# Altium PCB TriMod Adapter 2.PcbDoc (part 1 of 2)
Units mm, origin at the board's own origin, x right, y up, seen from the top; angles counter-clockwise.
Board outline 35.81 x 82.55 mm, 2 copper layers (Top Layer, Bottom Layer), stack 0.969 mm thick; 35 components, 110 nets, 330 pads, 112 vias.
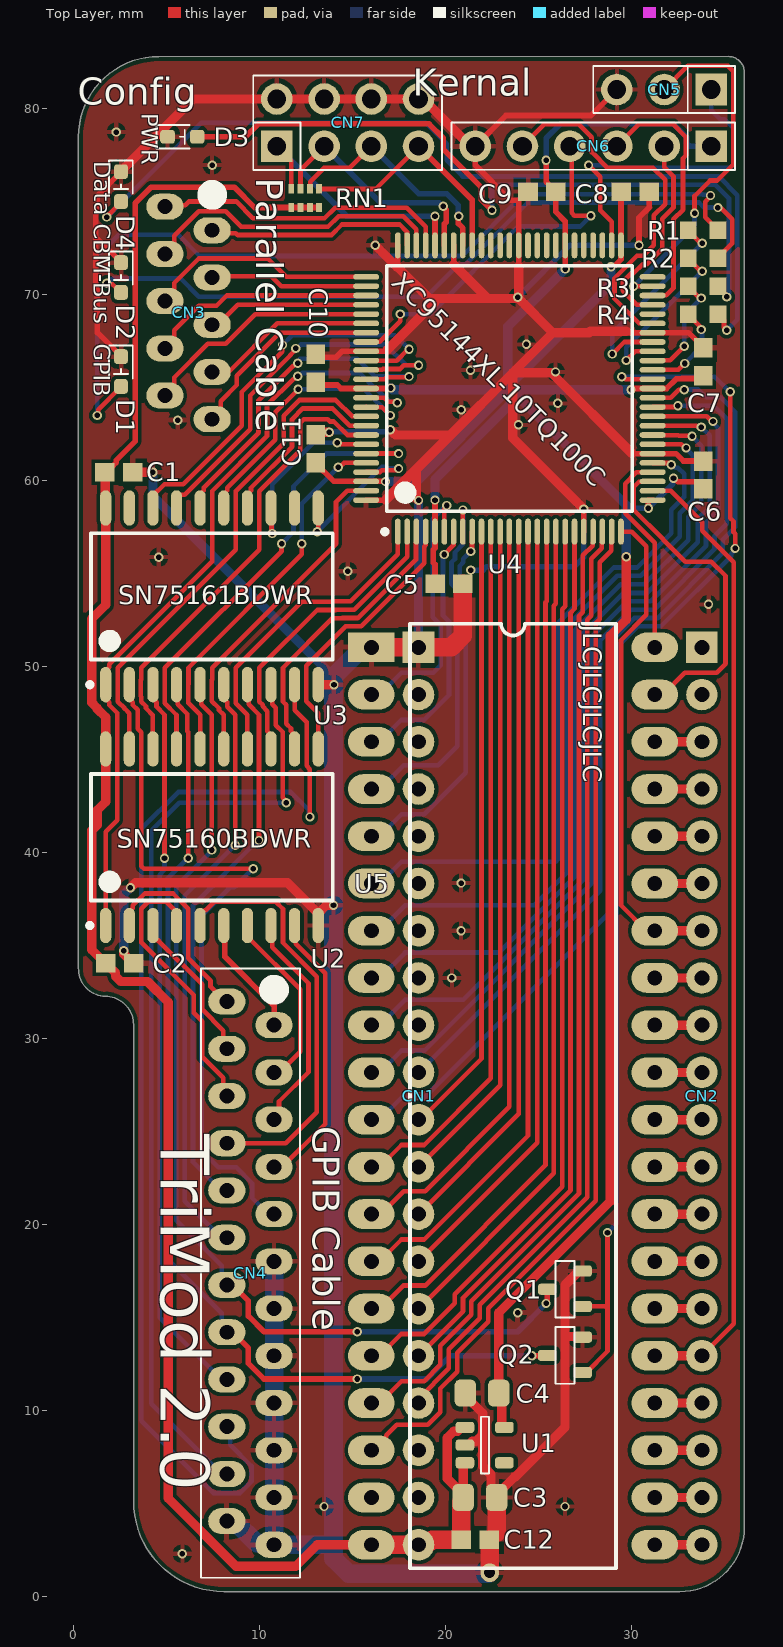
[diagram p0: Top Layer view]
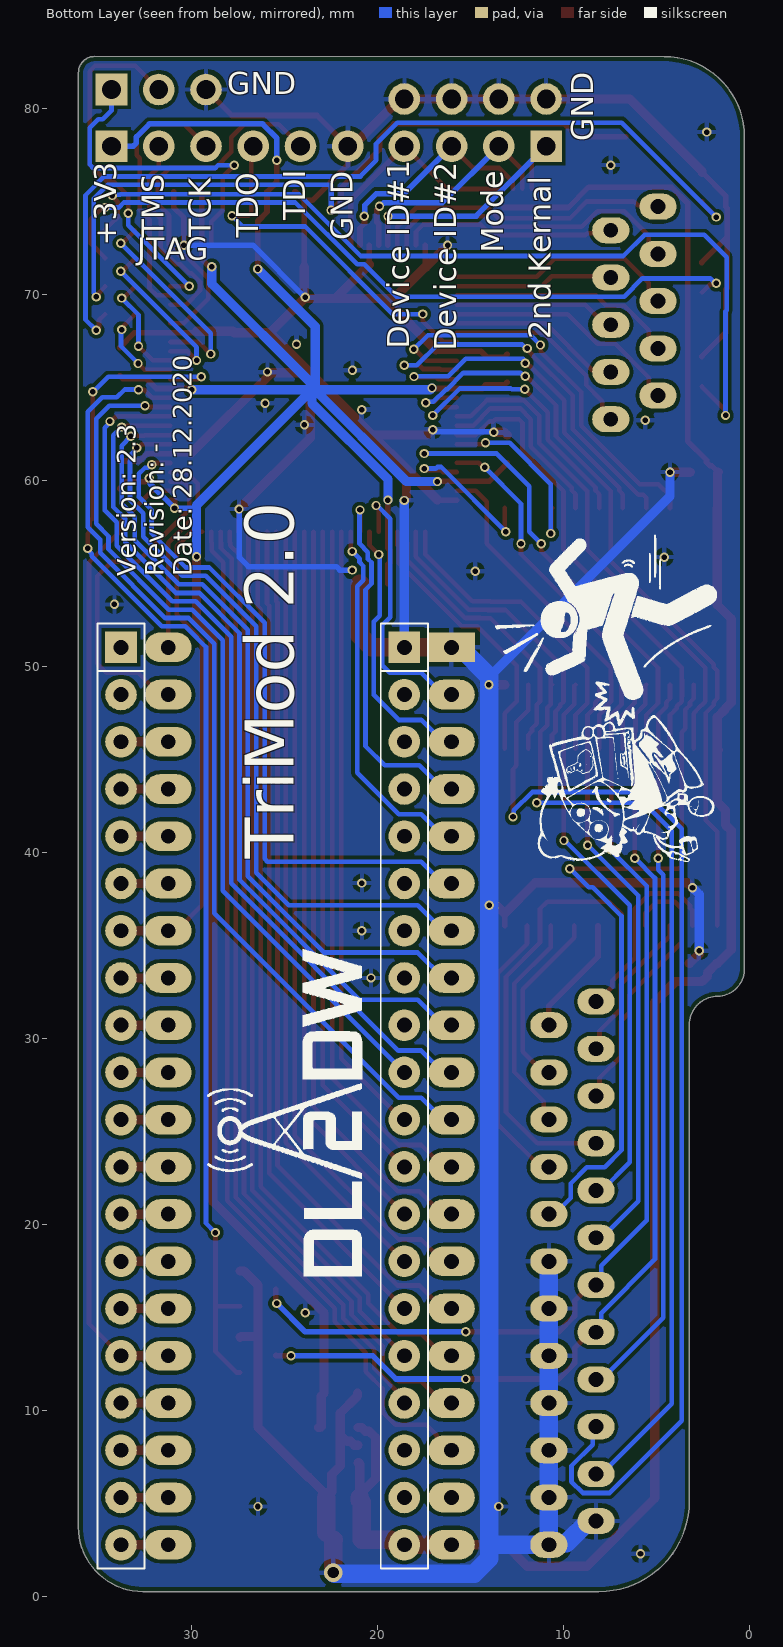
[diagram p1: Bottom Layer view, seen from below]
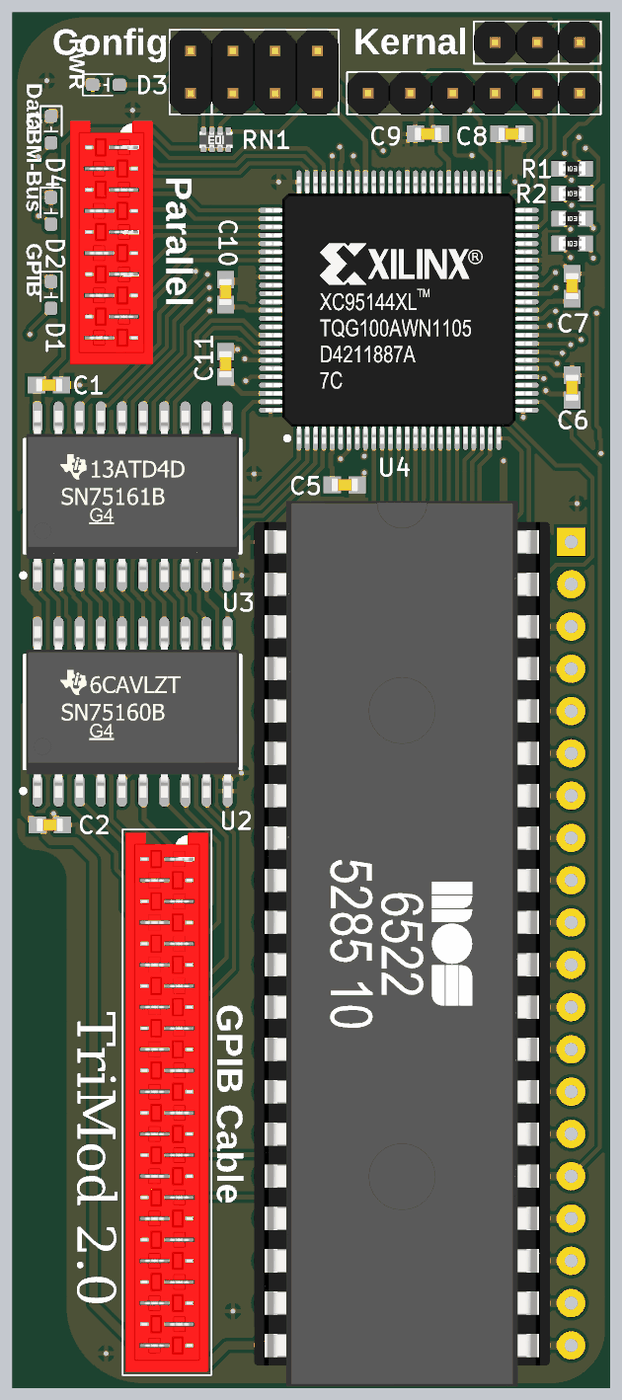
[diagram p2: 3D render of the assembled board from above, using the file's embedded part models]

## Layer stack, top to bottom
Top Solder: solder mask 0.0254, SM-001, Dk 4
Top Layer: signal copper 0.035
Dielectric 1: core 0.8986, Core-043, Dk 4.3
Bottom Layer: signal copper 0.035
Bottom Solder: solder mask 0.0254, SM-001, Dk 4

## Board outline
1.693,32.258 cw(c1.693,30.734) 3.217,30.734 3.217,5.114 ccw(c8.077,5.114) 8.077,0.254 31.496,0.254 32.599,0.254 ccw(c32.599,3.723) 36.068,3.723 36.068,81.937 ccw(c35.201,81.937) 35.201,82.804 4.568,82.8 ccw(c4.568,78.486) 0.254,78.486 0.254,33.782 ccw(c1.735,33.74)

## Design rules (kind name [scope] priority, off if disabled: settings)
BoardOutlineClearance [All] p1: gap=0.254 ignorepadtopadclearanceinfootprint=FALSE
Clearance [All] p1: gap=0.2 ignorepadtopadclearanceinfootprint=TRUE
ComponentClearance ComponentClearance_Sheet [HasFootprint('PCB Title Block DIN A4')] p1: gap=0 collisioncheckmode=3 verticalgap=0 showdistances=FALSE
ComponentClearance [All] p2: gap=0 collisioncheckmode=3 verticalgap=0 showdistances=FALSE
MinimumSolderMaskSliver [All] p1: minsoldermaskwidth=0.103
PolygonConnect [All] p1: connectstyle=Relief reliefconductorwidth=0.254 reliefentries=4 polygonreliefangle="90 Angle" airgapwidth=0.254
RoutingVias RoutingVias_Power [(InNet('+3V3') OR InNet('GND') OR InNet('+5V'))] p1: holewidth=0.6 width=1 viastyle="Through Hole" minholewidth=0.3 minwidth=0.5 maxholewidth=0.6 maxwidth=1
RoutingVias [All] p2: holewidth=0.3 width=0.5 viastyle="Through Hole" minholewidth=0.3 minwidth=0.5 maxholewidth=0.5 maxwidth=0.8
SilkToSilkClearance [All] p1: silktosilkclearance=0
SilkToSolderMaskClearance [IsPad] p1: minsilkscreentomaskgap=0 clearancetoexposedcopper=TRUE
SolderMaskExpansion [All] p1: expansion=0.038 istentingtop=FALSE
UnRoutedNet [All] p1: checkbadconnections=TRUE
Width Width_Power [(InNet('VCC') OR InNet('GND') OR InNet('+5V'))] p1: maxlimit=1 minlimit=0.3 preferedwidth=0.5
Width [All] p2: maxlimit=0.5 minlimit=0.25 preferedwidth=0.3
25 further rules are at their usual default settings.

## Components (designator, comment, footprint, x,y, rotation, side; value= is the part's Value field where it differs from the comment)
C1 "100nF" "CAP 100nF SMD 0603 C0603C104J3RACTU" 2.421,60.452 r180 top
C2 "100nF" "CAP 100nF SMD 0603 C0603C104J3RACTU" 2.467,34.036 r180 top
C3 "10µF" "Kemet C0805CxxxK8RACTU Series H=1.4mm" 21.844,5.31 r180 top
C4 "10µF" "Kemet C0805CxxxK8RACTU Series H=1.4mm" 21.96,10.922 r0 top
C5 "100nF" "CAP 100nF SMD 0603 C0603C104J3RACTU" 20.178,54.456 r180 top
C6 "100nF" "CAP 100nF SMD 0603 C0603C104J3RACTU" 33.842,60.298 r270 top
C7 "100nF" "CAP 100nF SMD 0603 C0603C104J3RACTU" 33.842,66.394 r270 top
C8 "100nF" "CAP 100nF SMD 0603 C0603C104J3RACTU" 30.201,75.54 r180 top
C9 "100nF" "CAP 100nF SMD 0603 C0603C104J3RACTU" 25.178,75.538 r0 top
C10 "100nF" "CAP 100nF SMD 0603 C0603C104J3RACTU" 13.014,66.04 r270 top
C11 "100nF" "CAP 100nF SMD 0603 C0603C104J3RACTU" 13.014,61.7 r270 top
C12 "100nF" "CAP 100nF SMD 0603 C0603C104J3RACTU" 21.59,3.048 r180 top
CN1 "Pin Header Left Side" "Pin Header 01x20 2.54mm precision Horizontal Male" 18.542,51.03 r270 top locked
CN2 "Pin Header Right Side" "Pin Header 01x20 2.54mm precision Horizontal Male" 33.782,51.03 r270 top locked
CN3 "Parallel Cable" "MPE 369-1-010 Buchsenleisten MicroMatch 1,27 mm,2X05,gerade" 6.172,69.011 r270 top
CN4 "GPIB Cable" "IEEE-488 Micro Match Connector" 9.502,17.375 r270 top
CN5 "Kernal" "Pin Header 01x03 2.54mm Horizontal Male" 34.29,81.026 r180 top
CN6 "JTAG" "Pin Header 01x06 2.54mm Horizontal Male" 34.29,77.978 r180 top
CN7 "Config" "Pin Header 02x04 2.54mm Horizontal Male" 10.922,77.978 r0 top
D1 "GPIB" "LED Blue SMD 0603" 2.54,65.861 r270 top
D2 "CBM-Bus" "LED Green SMD 0603" 2.54,70.916 r270 top
D3 "PWR" "LED Red SMD 0603" 5.842,78.486 r0 top
D4 "Data" "LED Yellow SMD 0603" 2.54,75.808 r270 top
Q1 "BCR135" "BCR135 SOT23" 26.416,16.51 r90 top
Q2 "BCR135" "BCR135 SOT23" 26.416,12.954 r90 top
R1 "1k" "1k Ohm R 0603 SMD" 33.842,73.45 r0 top
R2 "1k" "1k Ohm R 0603 SMD" 33.842,71.95 r0 top
R3 "1k" "1k Ohm R 0603 SMD" 33.842,70.45 r0 top
R4 "1k" "1k Ohm R 0603 SMD" 33.842,68.95 r0 top
RN1 "10k" "RES ARRAY 4 RES 10K OHM 0804" 12.446,75.184 r270 top
U1 "SPX5205M5-L-3-3/TR" SOT-23-5 22.098,8.128 r270 top
U2 "SN75160BDWR" "SN75160BDWR SOIC-20 W7.5mm P1,27mm" 7.432,40.818 r90 top locked
U3 "SN75161BDWR" "SN75161BDWR SOIC-20 W7.5mm P1,27mm" 7.432,53.772 r90 top
U4 "XC95144XL-10TQ100C" "TQFP-100 P0.5mm XC95144XL-7TQ100C" 23.428,64.95 r90 top locked
U5 "MOS 6522" "MOS 6522 with Socket" 16.002,51.03 r0 top locked

## Footprints (in the part's own frame and the unit in brackets; to place one, negate y for a bottom-side part, rotate by r counter-clockwise, add the part's x,y. Pads: shape width x height; smd on the part's side, far side on the other; paste and mask are expansions set on the pad)
"1k Ohm R 0603 SMD" [mm] "Chip Resistor 2-Leads, Body 1,60x0,80mm, IPC Medium Density"
  rect 0.9x0.95 smd: 1(-0.8,0) 2(0.8,0)
  body extent -0.8,-0.4 0.8,0.4, height 0.45
"BCR135 SOT23" [mm]
  rrect50% 0.6x1 smd: 1(-0.924,-0.95) 2(0.976,-0.95) 3(0,0.95)
  silkscreen extent -1.52,-0.51 1.52,0.51, body extent -1.45,-1.15 1.45,1.15, height 1
"CAP 100nF SMD 0603 C0603C104J3RACTU" [mm] "Chip Capacitor, 2-Leads, Body 1,60x0,80mm, IPC Medium Density"
  rect 1.05x1 smd: 1(-0.75,0) 2(0.75,0)
  body extent -0.8,-0.4 0.8,0.4, height 0.87
"IEEE-488 Micro Match Connector" [mm]
  oval 1.4x2 hole 0.8: 1(-14.605,-1.27) 2(-12.065,-1.27) 3(-9.525,-1.27) 4(-6.985,-1.27) 5(-4.445,-1.27) 6(-1.905,-1.27) 7(0.635,-1.27) 8(3.175,-1.27) 9(5.715,-1.27) 10(8.255,-1.27) 11(10.795,-1.27) 12(13.335,-1.27) 13(-13.335,1.27) 14(-10.795,1.27) 15(-8.255,1.27) 16(-5.715,1.27) 17(-3.175,1.27) 18(-0.635,1.27) 19(1.905,1.27) 20(4.445,1.27) 21(6.985,1.27) 22(9.525,1.27) 23(12.065,1.27) 24(14.605,1.27)
  silkscreen extent -16.38,-2.67 16.38,2.67, body extent -16.2,-2.5 16.2,2.5, height 3.95
"Kemet C0805CxxxK8RACTU Series H=1.4mm" [mm]
  rrect50% 1.15x1.45 smd: 1(-0.9,0) 2(0.9,0)
  body extent -1,-0.62 1,0.62, height 1.4
"LED Blue SMD 0603" [mm]
  rrect50% 0.8x0.75 smd: 1(-0.8,0) 2(0.8,0)
  silkscreen extent -1.4,-0.64 0.38,0.64, body extent -0.8,-0.4 0.8,0.4, height 0.4
"LED Green SMD 0603" [mm]
  rrect50% 0.8x0.75 smd: 1(-0.8,0) 2(0.8,0)
  silkscreen extent -1.4,-0.64 0.38,0.64, body extent -0.8,-0.4 0.8,0.4, height 0.4
"LED Red SMD 0603" [mm]
  rrect50% 0.8x0.75 smd: 1(-0.8,0) 2(0.8,0)
  silkscreen extent -1.4,-0.64 0.38,0.64, body extent -0.8,-0.4 0.8,0.4, height 0.4
"LED Yellow SMD 0603" [mm]
  rrect50% 0.8x0.75 smd: 1(-0.8,0) 2(0.8,0)
  silkscreen extent -1.4,-0.64 0.38,0.64, body extent -0.8,-0.4 0.8,0.4, height 0.4
"MOS 6522 with Socket" [mm]
  rect 2.5x1.6 hole 0.8: 1(0,0)
  oval 2.5x1.6 hole 0.8: 2(0,-2.54) 3(0,-5.08) 4(0,-7.62) 5(0,-10.16) 6(0,-12.7) 7(0,-15.24) 8(0,-17.78) 9(0,-20.32) 10(0,-22.86) 11(0,-25.4) 12(0,-27.94) 13(0,-30.48) 14(0,-33.02) 15(0,-35.56) 16(0,-38.1) 17(0,-40.64) 18(0,-43.18) 19(0,-45.72) 20(0,-48.26) 21(15.24,-48.26) 22(15.24,-45.72) 23(15.24,-43.18) 24(15.24,-40.64) 25(15.24,-38.1) 26(15.24,-35.56) 27(15.24,-33.02) 28(15.24,-30.48) 29(15.24,-27.94) 30(15.24,-25.4) 31(15.24,-22.86) 32(15.24,-20.32) 33(15.24,-17.78) 34(15.24,-15.24) 35(15.24,-12.7) 36(15.24,-10.16) 37(15.24,-7.62) 38(15.24,-5.08) 39(15.24,-2.54) 40(15.24,0)
  silkscreen extent 2.08,-49.53 13.16,1.27, body extent -1.27,-50.73 16.51,2.47, height 8.6
"MPE 369-1-010 Buchsenleisten MicroMatch 1,27 mm,2X05,gerade" [mm]
  oval 1.4x2 hole 0.8: 1(-5.715,-1.27) 2(-4.445,1.27) 3(-3.175,-1.27) 4(-1.905,1.27) 5(-0.635,-1.27) 6(0.635,1.27) 7(1.905,-1.27) 8(3.175,1.27) 9(4.445,-1.27) 10(5.715,1.27)
  silkscreen extent -6.65,0.97 -6.05,1.57, body extent -7.31,-2.5 7.31,2.5, height 3.95
"Pin Header 01x03 2.54mm Horizontal Male" [mm]
  rect 1.7x1.7 hole 1: 1(0,0)
  round 1.7 hole 1: 2(2.54,0) 3(5.08,0)
  silkscreen extent -1.27,-1.27 6.35,1.27, body extent -1.27,-1.27 6.35,1.27, height 8.34
"Pin Header 01x06 2.54mm Horizontal Male" [mm]
  rect 1.7x1.7 hole 1: 1(0,0)
  round 1.7 hole 1: 2(2.54,0) 3(5.08,0) 4(7.62,0) 5(10.16,0) 6(12.7,0)
  silkscreen extent -1.27,-1.27 13.97,1.27, body extent -1.27,-1.27 13.97,1.27, height 8.34
"Pin Header 01x20 2.54mm precision Horizontal Male" [mm] "Precision"
  rect 1.7x1.7 hole 0.8: 1(0,0)
  round 1.7 hole 0.8: 2(2.54,0) 3(5.08,0) 4(7.62,0) 5(10.16,0) 6(12.7,0) 7(15.24,0) 8(17.78,0) 9(20.32,0) 10(22.86,0) 11(25.4,0) 12(27.94,0) 13(30.48,0) 14(33.02,0) 15(35.56,0) 16(38.1,0) 17(40.64,0) 18(43.18,0) 19(45.72,0) 20(48.26,0)
  body extent -1.27,-1.27 49.53,1.27, height 1.8
"Pin Header 02x04 2.54mm Horizontal Male" [mm]
  rect 1.7x1.7 hole 1: 1(0,0)
  round 1.7 hole 1: 2(0,2.54) 3(2.54,0) 4(2.54,2.54) 5(5.08,0) 6(5.08,2.54) 7(7.62,0) 8(7.62,2.54)
  silkscreen extent -1.27,-1.27 8.89,3.81, body extent -1.27,-1.27 8.89,3.81, height 8.34
"RES ARRAY 4 RES 10K OHM 0804" [mm] "Chip Array, Concave, 8-Leads, Pitch 0,50mm,  Body 2,00x1,00mm,  IPC Medium Density"
  rect 0.5x0.32 smd: 1(-0.5,0.75) 2(-0.5,0.25) 3(-0.5,-0.25) 4(-0.5,-0.75) 5(0.5,-0.75) 6(0.5,-0.25) 7(0.5,0.25) 8(0.5,0.75)
  body extent -0.5,-1 0.5,1, height 0.4
"SN75160BDWR SOIC-20 W7.5mm P1,27mm" [mm] "SOIC, 20-Leads, Body 12,80x7,50mm, Pitch 1,27mm, IPC Medium Density"
  oval 1.9x0.6 smd: 1(-4.75,5.715) 2(-4.75,4.445) 3(-4.75,3.175) 4(-4.75,1.905) 5(-4.75,0.635) 6(-4.75,-0.635) 7(-4.75,-1.905) 8(-4.75,-3.175) 9(-4.75,-4.445) 10(-4.75,-5.715) 11(4.75,-5.715) 12(4.75,-4.445) 13(4.75,-3.175) 14(4.75,-1.905) 15(4.75,-0.635) 16(4.75,0.635) 17(4.75,1.905) 18(4.75,3.175) 19(4.75,4.445) 20(4.75,5.715)
  silkscreen extent -4.87,-6.5 3.4,6.69, body extent -5.15,-6.4 5.15,6.4, height 2.65
"SN75161BDWR SOIC-20 W7.5mm P1,27mm" [mm] "SOIC, 20-Leads, Body 12,80x7,50mm, Pitch 1,27mm, IPC Medium Density"
  oval 1.9x0.6 smd: 1(-4.75,5.715) 2(-4.75,4.445) 3(-4.75,3.175) 4(-4.75,1.905) 5(-4.75,0.635) 6(-4.75,-0.635) 7(-4.75,-1.905) 8(-4.75,-3.175) 9(-4.75,-4.445) 10(-4.75,-5.715) 11(4.75,-5.715) 12(4.75,-4.445) 13(4.75,-3.175) 14(4.75,-1.905) 15(4.75,-0.635) 16(4.75,0.635) 17(4.75,1.905) 18(4.75,3.175) 19(4.75,4.445) 20(4.75,5.715)
  silkscreen extent -4.87,-6.5 3.4,6.69, body extent -5.15,-6.4 5.15,6.4, height 2.65
SOT-23-5 [mm]
  rrect50% 0.6x1 smd: 1(-0.95,-1.06) 2(0,-1.06) 3(0.95,-1.06) 4(0.95,1.06) 5(-0.95,1.06)
  silkscreen extent -1.52,-0.2 1.52,0.23, body extent -1.45,-1.41 1.45,1.41, height 1.3
"TQFP-100 P0.5mm XC95144XL-7TQ100C" [mm] "TSQFP, 100-Leads, Body 14,00x14,00mm, Pitch 0,50mm, IPC Medium Density"
  oval 1.4x0.3 smd: 1(-7.7,6) 2(-7.7,5.5) 3(-7.7,5) 4(-7.7,4.5) 5(-7.7,4) 6(-7.7,3.5) 7(-7.7,3) 8(-7.7,2.5) 9(-7.7,2) 10(-7.7,1.5) 11(-7.7,1) 12(-7.7,0.5) 13(-7.7,0) 14(-7.7,-0.5) 15(-7.7,-1) 16(-7.7,-1.5) 17(-7.7,-2) 18(-7.7,-2.5) 19(-7.7,-3) 20(-7.7,-3.5) 21(-7.7,-4) 22(-7.7,-4.5) 23(-7.7,-5) 24(-7.7,-5.5) 25(-7.7,-6) 51(7.7,-6) 52(7.7,-5.5) 53(7.7,-5) 54(7.7,-4.5) 55(7.7,-4) 56(7.7,-3.5) 57(7.7,-3) 58(7.7,-2.5) 59(7.7,-2) 60(7.7,-1.5) 61(7.7,-1) 62(7.7,-0.5) 63(7.7,0) 64(7.7,0.5) 65(7.7,1) 66(7.7,1.5) 67(7.7,2) 68(7.7,2.5) 69(7.7,3) 70(7.7,3.5) 71(7.7,4) 72(7.7,4.5) 73(7.7,5) 74(7.7,5.5) 75(7.7,6)
  oval 0.3x1.4 smd: 26(-6,-7.7) 27(-5.5,-7.7) 28(-5,-7.7) 29(-4.5,-7.7) 30(-4,-7.7) 31(-3.5,-7.7) 32(-3,-7.7) 33(-2.5,-7.7) 34(-2,-7.7) 35(-1.5,-7.7) 36(-1,-7.7) 37(-0.5,-7.7) 38(0,-7.7) 39(0.5,-7.7) 40(1,-7.7) 41(1.5,-7.7) 42(2,-7.7) 43(2.5,-7.7) 44(3,-7.7) 45(3.5,-7.7) 46(4,-7.7) 47(4.5,-7.7) 48(5,-7.7) 49(5.5,-7.7) 50(6,-7.7) 76(6,7.7) 77(5.5,7.7) 78(5,7.7) 79(4.5,7.7) 80(4,7.7) 81(3.5,7.7) 82(3,7.7) 83(2.5,7.7) 84(2,7.7) 85(1.5,7.7) 86(1,7.7) 87(0.5,7.7) 88(0,7.7) 89(-0.5,7.7) 90(-1,7.7) 91(-1.5,7.7) 92(-2,7.7) 93(-2.5,7.7) 94(-3,7.7) 95(-3.5,7.7) 96(-4,7.7) 97(-4.5,7.7) 98(-5,7.7) 99(-5.5,7.7) 100(-6,7.7)
  silkscreen extent -7.82,-6.6 6.6,6.82, body extent -8.01,-8.01 8.01,8.01, height 1.5

## Part data
C1 C2 C5 C6 C7 C8 C9 C10 C11 C12: library part CMP-Capacitors-Ceramic_Capacitors-00012-1, "KEMET         C0603C104J3RACTU             SMD Multilayer Ceramic Capacitor, 0603 [1608 Metric], 0.1 F, 25 V,  5%, X7R, C Series", Case Code (Imperial)=0603, Case Code (Metric)=1608, Dielectric=X7R, Dielectric Material=Ceramic, Max Operating Temperature=125°C, Min Operating Temperature=-55°C, Package Quantity=4000, Tolerance=5%, Voltage=25V, Capacitance=100nF, Case/Package=0603, Contact Plating=Tin,Matte, Depth=0.8mm, Height=0.8mm, Lead Pitch=0.7mm, Length=1.6mm, Mount="Surface Mount,PCB", Number of Pins=2, Packaging="Tape and Reel", Radiation Hardening=No, REACH SVHC="No SVHC", Termination=SMD/SMT, Thickness=0.034inch, Voltage Rating=25V, Voltage Rating (DC)=25V, Width=0.031inch
C3 C4: library part CMP-Capacitors-Ceramic_Capacitors-00016-2, "KEMET - C0805C106K8RACTU - CAP, 10µF, 10V, 10%, X7R, 0805", Capacitance=10uF, Case Code (Imperial)=0805, Case Code (Metric)=2012, Dielectric=X7R, Dielectric Material=Ceramic, Max Operating Temperature=125°C, Min Operating Temperature=-55°C, Package Quantity=1, Tolerance=10%, Voltage=10V, Case/Package=0805, Depth=1.25mm, Dissipation Factor=7.5%, Height=1.25mm, Length=2mm, Mount="Surface Mount,PCB", Packaging="Tape and Reel", REACH SVHC="No SVHC", Termination=SMD/SMT, Thickness=0.055inch, Voltage Rating=10V, Voltage Rating (DC)=10V, Width=1.2mm
CN1 CN2: library part CMP-Connectors-Male_PIN_Headers-00031-2, "Conn Header Vert 20POS 2MM", Color=Black, Package Quantity=250, Connector Type="Male Pin", Contact Mating Length=0.141inch, Contact Plating=Gold, Mount="Through Hole", Number of Positions=20, Number of Rows=1, Packaging=Bulk, Pitch=0.079inch, Termination=Solder
CN3: library part CMP-Connectors-IDC_Connectors-00031-3, "Grid pitch: 1.27 mm BL2/15-0400GTT-010 RU MPE Garry Conten", Contact Material=Bronze,Tin, Height=3.95mm, Insulation Material=Thermoplastic, Length=14.62mm, Pitch=1.27mm, Width=5mm
CN4: library part CMP-Commodore-00011-5, "IEEE-488 IDC Connector Right Angle or Straight"
CN5: library part CMP-Connectors-Male_PIN_Headers-00002-3, "CONN HEADER .100\" SNGL STR 3POS", Color=Black, Package Quantity=1, Connector Type="Male Pin", Contact Mating Length=0.318inch, Contact Plating=Gold, Mount="Through Hole", Number of Positions=3, Number of Rows=1, Packaging=Bulk, Pitch=0.1inch, Termination=Solder
CN6: library part CMP-Connectors-Male_PIN_Headers-00005-2, "CONN HEADER VERT 6POS 2.54MM", Color=Black, Package Quantity=1, Connector Type="Male Pin", Contact Mating Length=0.318inch, Contact Plating=Gold, Mount="Through Hole", Number of Positions=6, Number of Rows=1, Packaging=Bulk, Pitch=0.1inch, Termination=Solder
CN7: library part CMP-Connectors-Male_PIN_Headers-00033-2, "CONN HEADER .100\" DUAL STR 8POS", Color=Black, Package Quantity=1, Connector Type="Male Pin", Contact Mating Length=0.318inch, Contact Plating=Gold, Contact Type="Male Pin", Mount="Through Hole", Number of Positions=8, Number of Rows=2, Packaging=Bulk, Pitch=0.1inch, RoHS Compliant=Yes, Row Spacing=0.1inch, Series=-, Termination=Solder
D1: library part CMP-LEDs-00001-1, "LED BLUE DIFFUSED 0603 SMD", Case/Package=0603, Color=Blue, Forward Voltage=3.2V, Test Current=20mA, Dominant Wavelength=470nm, Height=0.5mm, Length=1.6mm, Lens Size=0.8mm, Lens Style=Flat, Lens Transparency=Diffused, Luminous Intensity=80mcd, Mount="Surface Mount", Packaging="Tape and Reel", Viewing Angle=140°, Width=0.8mm
D2: library part CMP-LEDs-00004-2, "LED BLUE DIFFUSED 0603 SMD", Case/Package=0603, Color=Blue, Forward Voltage=3.2V, Test Current=20mA, Dominant Wavelength=470nm, Height=0.5mm, Length=1.6mm, Lens Size=0.8mm, Lens Style=Flat, Lens Transparency=Diffused, Luminous Intensity=80mcd, Mount="Surface Mount", Packaging="Tape and Reel", Viewing Angle=140°, Width=0.8mm
D3: library part CMP-LEDs-00005-1, "LED RED DIFFUSED 0603 SMD", Case Code (Imperial)=0603, Case Code (Metric)=1608, Color=Red, Forward Voltage=2V, Test Current=20mA, Case/Package=0603, Dominant Wavelength=630nm, Height=0.5mm, Length=1.6mm, Lens Size=0.8mm, Lens Style=Flat, Lens Transparency=Diffused, Luminous Intensity=70mcd, Mount="Surface Mount", Packaging="Tape and Reel", Viewing Angle=140°, Width=0.8mm
D4: library part CMP-LEDs-00003-2, "LED YELLOW DIFFUSED 0603 SMD", Case Code (Imperial)=0603, Case Code (Metric)=1608, Color=Yellow, Forward Voltage=2V, Test Current=20mA, Case/Package=0603, Dominant Wavelength=589nm, Height=0.5mm, Length=1.6mm, Lens Size=0.8mm, Lens Style=Flat, Lens Transparency=Diffused, Luminous Intensity=100mcd, Mount="Surface Mount", Packaging="Cut Tape", Viewing Angle=140°, Width=0.8mm
Q1 Q2: library part CMP-Transistors-00010-1, "BCR135 Series NPN 50 V 100 mA SMT Silicon Digital Transistor - SOT-23-3", Case/Package=SOT, Collector Emitter Saturation Voltage=300mV, Collector Emitter Voltage (VCEO)=50V, Max Collector Current=100mA, Max Operating Temperature=150°C, Min Operating Temperature=-65°C, Power Dissipation=200mW, Element Configuration=Single, Height=1mm, hFE Min=70, Length=2.9mm, Number of Pins=3, Packaging="Tape and Reel", Polarity=NPN, Width=1.3mm
R1 R2 R3 R4: library part CMP-Resistors-Yageo_SMD_060300002-2, "RES SMD 1K OHM 1% 1/10W 0603", Case Code (Imperial)=0603, Case Code (Metric)=1608, Max Operating Temperature=155°C, Min Operating Temperature=-55°C, Power Rating=100mW, Resistance=1kR, Resistor Type="Thick Film", Temperature Coefficient=100ppm/°C, Tolerance=1%, Voltage Rating=50V, Case/Package=0603, Contact Plating=Tin,Matte, Depth=0.8mm, Height=0.45mm, Lead Free="Lead Free", Length=1.6mm, Military Standard=Not, Packaging="Tape and Reel", Radiation Hardening=No, REACH SVHC="No SVHC", Termination=SMD/SMT
RN1: library part CMP-Resistors-Resistor_Array00009-1, "RES ARRAY 4 RES 10K OHM 0804", Case/Package=0804, Max Operating Temperature=125°C, Min Operating Temperature=-55°C, Number of Resistors=4, Power Per Element=62.5mW, Resistance=10kR, Temperature Coefficient=200ppm/°C, Tolerance=1%, Circuit Type=Isolated, Height=0.02inch, Length=0.079inch, Mount="Surface Mount", Number of Circuits=4, Number of Pins=8, Packaging="Tape and Reel", Width=0.039inch
U1: library part CMP-ICs-Power_Supply-00002-2, "LDO Regulator Pos 3.3V 0.15A 5-Pin SOT-23 T/R", Case/Package=SOT-23, Dropout Voltage=210mV, Max Input Voltage=16V, Max Operating Temperature=125°C, Max Output Current=150mA, Min Input Voltage=2.5V, Min Operating Temperature=-40°C, Min Output Voltage=3.3V, Quiescent Current=1uA, Accuracy=1%, Height=1.15mm, Lead Free="Lead Free", Length=2.9mm, Mount="Surface Mount", Number of Outputs=1, Number of Pins=5, Number of Regulators=1, Output Current=150mA, Output Type=Fixed, Output Voltage=3.3V, Packaging="Tape and Reel", Polarity=Positive, Radiation Hardening=No, Width=1.6mm
U2: library part CMP-ICs-Specials-00023-1, "TEXAS INSTRUMENTS         SN75160BDWR.            GENERAL-PURPOSE INTERFACE BUS  ((NW))", Case/Package=SOIC, High Level Output Current=-5.2mA, Low Level Output Current=48mA, Max Operating Temperature=70°C, Max Supply Current=110mA, Max Supply Voltage=5.25V, Min Operating Temperature=0°C, Min Supply Voltage=4.75V, Operating Supply Voltage=5V, Package Quantity=1, Contact Plating=Gold, ESD Protection=No, Lead Free="Lead Free", Logic Function=Transceiver, Mount="Surface Mount", Nominal Supply Current=110mA, Number of Channels=8, Number of Drivers=8, Number of Pins=20, Number of Receivers=8, Number of Transceivers=1, Number of Transmitters=8, Output Current=48mA, Packaging="Tape and Reel", Propagation Delay=22ns, Radiation Hardening=No, REACH SVHC="No SVHC", Weight=0.018953oz
U3: library part CMP-ICs-Specials-00022-2, "TEXAS INSTRUMENTS         SN75161BDWR", Case/Package=SOIC, High Level Output Current=-5.2mA, Low Level Output Current=48mA, Max Operating Temperature=70°C, Max Supply Voltage=5.25V, Min Operating Temperature=0°C, Min Supply Voltage=4.75V, Nominal Supply Current=110mA, Operating Supply Voltage=5V, Package Quantity=1, Lead Free="Lead Free", Logic Function=Transceiver, Mount="Surface Mount", Number of Channels=8, Number of Drivers=8, Number of Pins=20, Number of Receivers=8, Number of Transceivers=1, Number of Transmitters=8, Operating Supply Current=110mA, Output Current=48mA, Packaging="Tape and Reel", Propagation Delay=22ns, Radiation Hardening=No, REACH SVHC="No SVHC", Weight=0.018953oz
U4: library part CMP-ICs-CPLD_FPGA-00000-1, "IC CPLD 144MC 7.5NS 100TQFP", Case/Package=LQFP, Max Frequency=125MHz, Max Operating Temperature=70°C, Max Supply Voltage=3.6V, Min Operating Temperature=0°C, Min Supply Voltage=3V, Operating Supply Voltage=3.3V, Package Quantity=90, Contact Plating=Tin,Lead, Lead Free="Contains Lead", Memory Type=FLASH, Mount="Surface Mount", Number of Gates=3200, Number of I/Os=81, Number of Logic Blocks (LABs)=8, Number of Logic Elements/Cells=8, Number of Macrocells=144, Number of Pins=100, Packaging=Tray, Propagation Delay=7.5ns, Speed Grade=7, Turn-On Delay Time=7.5ns
U5: library part CMP-ICs-Specials-00001-3, "I/O Controller Interface IC Versatile Interface Adapter", Case/Package=PDIP, Max Operating Temperature=85°C, Min Operating Temperature=-40°C, Operating Supply Current=500uA, Operating Supply Voltage=5V, Data Bus Width=8b, Interface=Serial, Packaging=Rail/Tube, Weight=0.210004oz

## Via types
v1: diameter 0.5, hole 0.3, Top Layer to Bottom Layer, tented both sides, 111 vias
v2: diameter 1, hole 0.6, Top Layer to Bottom Layer, tented both sides, 1 vias

## Nets (pads, with @x,y where several pads share a name; then routed paths per layer and width w, separated by ;. In a path a pad name is that pad's centre, name@x,y a point inside that pad or via, vN(x,y) a via of type N, cw(c..) or ccw(c..) an arc to the next point about the centre after c; other vN are vias at no path point)
+3V3: C4.2 C5.2 C6.2 C7.2 C8.2 C9.2 C10.2 C11.2 CN6.1 U1.5 U4.5 U4.26 U4.38 U4.51 U4.57 U4.88 U4.98 | length 151.9
  Top Layer w0.3: C11.2 13.014,60.925 13.989,59.95 U4.98 16.758,59.95 v1(16.764,59.944) ; C10.2 13.168,65.136 14.178,65.136 14.364,64.95 U4.88 17.03,64.95 v1(17.055,64.975) ; C5.2 19.428,55.488 19.328,55.588 19.328,56.27 19.428,56.37 U4.5 v1(19.428,58.95) ; v1(25.4,77.216) 25.4,76.066 25.553,75.913 25.553,75.888 25.903,75.538 C9.2 25.928,74.444 26.428,73.944 U4.57 v1(26.428,71.374) ; v1(28.895,71.501) 28.933,71.539 29.074,71.539 29.428,71.893 U4.51 29.428,75.517 C8.2 ; v1(29.97,64.875) 30.025,64.875 30.1,64.95 U4.38 31.885,64.95 32.41,65.475 32.715,65.475 32.728,65.488 33.686,65.488 C7.2 ; v1(30.905,58.516) 30.905,58.95 U4.26 ; v1(32.254,60.118) 32.308,60.118 32.503,59.923 33.492,59.923 33.842,59.573 C6.2
  Top Layer w0.5: U1.5 23.059,9.078 23.009,9.128 23.009,10.773 C4.2 22.86,15.253 28.853,21.246 28.853,51.649 29.718,52.514 v1(29.718,55.898)
  Bottom Layer w0.3: 23.34,65.024 23.48,65.164 ; v1(25.4,77.216) 25.4,78.405 26.173,79.178 32.247,79.178 32.95,78.475 32.95,78.154 33.126,77.978 CN6.1 ; 29.718,58.674 29.876,58.516 v1(30.905,58.516) 32.216,59.827 32.216,60.08 v1(32.254,60.118)
  Bottom Layer w0.5: v1(16.764,59.944) 18.428,59.944 23.368,64.884 17.146,64.884 v1(17.055,64.975) ; v1(19.428,58.95) 19.428,60.068 23.508,64.148 23.508,64.884 ; 23.48,64.884 23.34,65.024 23.34,68.286 v1(26.428,71.374) ; 23.48,65.164 28.895,70.578 v1(28.895,71.501) ; v1(29.718,55.898) 29.718,58.674 23.508,64.884 ; v1(29.97,64.875) 29.961,64.884 23.508,64.884
+5V: C1.2 C2.2 C3.2 C12.2 CN1.20 RN1.5 RN1.6 RN1.7 RN1.8 U1.1 U1.3 U2.20 U3.20 U5.20 | length 111.2
  Top Layer w0.3: C1.2 2.021,60.802 2.12,60.802 2.296,60.978 2.296,61.097 3.302,62.103 3.302,74.911 4.167,75.776 8.632,75.776 9.724,74.684 RN1.5 RN1.6 RN1.7 RN1.8
  Top Layer w0.5: C1.2 1.698,60.425 1.698,58.541 U3.20 1.717,53.319 0.967,52.569 0.967,48.061 1.27,47.758 1.27,47.711 1.717,47.264 U2.20 1.717,45.563 1.671,45.517 1.717,45.471 1.717,42.718 1.27,42.271 1.27,41.481 0.967,41.178 0.967,34.761 1.692,34.036 1.742,34.036 2.242,33.536 2.242,33.348 2.535,33.055 3.964,33.055 5.08,31.939 5.08,5.266 8.726,1.62 11.945,1.62 13.095,2.77 U5.20 ; C3.2@20.84,5.31 20.84,5.584 20.088,6.336 20.088,8.527 20.439,8.878 20.638,8.878 20.838,9.078 U1.1 ; C3.2@20.944,5.584 20.944,7.128 20.994,7.178 U1.3
  Top Layer w1: U5.20 CN1.20 18.676,2.904 19.133,2.904 19.277,3.048 C12.2 20.84,5.056 20.944,5.16 C3.2
A0: CN2.3 U5.38 | length 2.5
  Top Layer w0.5: U5.38 CN2.3
A1: CN2.4 U5.37 | length 2.5
  Top Layer w0.5: U5.37 CN2.4
A2: CN2.5 U5.36 | length 2.5
  Top Layer w0.5: U5.36 CN2.5
A3: CN2.6 U5.35 | length 2.5
  Top Layer w0.5: U5.35 CN2.6
ATN: CN4.11 U3.8 | length 51.7
  Top Layer w0.25: U3.8 10.674,48.955 10.674,47.972 10.862,47.784 10.862,46.847 11.232,46.477 11.232,42.938 11.43,42.74 v1(11.43,42.672) ; U3.8@10.668,49.022 U3.8@10.668,49.672
  Bottom Layer w0.25: CN4.11 7.932,6.58 4.167,10.345 4.167,41.163 5.676,42.672 v1(11.43,42.672)
C\E\: CN2.18 U5.23 | length 2.5
  Top Layer w0.5: U5.23 CN2.18
CA1: U4.29 U5.40 | length 11.2
  Top Layer w0.25: U4.29 31.118,60.44 30.26,60.44 29.653,59.833 29.653,58.247 31.242,56.658 U5.40
CA2: U4.28 U5.39 | length 18
  Top Layer w0.25: U4.28 31.118,59.94 30.397,59.94 30.103,59.647 30.103,58.433 31.692,56.844 31.692,56.814 32.88,55.626 34.29,55.626 35.052,54.864 35.052,50.14 34.577,49.665 32.867,49.665 31.692,48.49 U5.39
CB1: U4.24 U5.18 | length 55.8
  Top Layer w0.25: U5.18 16.087,7.85 16.808,8.571 16.808,8.656 17.367,9.215 19.029,9.215 19.717,9.903 19.717,11.171 20.617,12.071 20.617,13.096 22.285,14.764 22.285,15.491 28.067,21.273 28.067,52.328 28.278,52.539 28.278,55.605 28.903,56.23 28.903,56.64 28.918,56.655 28.918,57.24 U4.24
CE: CN2.17 U5.24 | length 2.5
  Top Layer w0.5: U5.24 CN2.17
CLK: CN2.16 U4.27 U5.25 | length 52.2
  Top Layer w0.25: U4.27 32.103,59.45 33.802,57.751 33.802,57.296 35.502,55.596 35.502,14.65 CN2.16
  Top Layer w0.5: U5.25 CN2.16
CS_160: U2.11 U4.4 | length 15.1
  Top Layer w0.25: U2.11 13.147,47.488 12.502,48.133 12.502,50.04 14.617,52.155 15.457,52.155 18.853,55.551 18.853,56.453 18.903,56.503 18.903,56.516 18.918,56.532 18.918,57.24 U4.4
CS_161: U3.11 U4.97 | length 9
  Top Layer w0.25: v1(13.089,57.25) 13.147,57.308 U3.11 ; U4.97 15.738,60.46 16.466,60.46 16.565,60.559 17.315,60.559 17.4,60.644 v1(17.468,60.644)
  Bottom Layer w0.25: v1(13.089,57.25) 16.565,60.726 16.772,60.726 16.855,60.644 v1(17.468,60.644)
D0: CN2.8 U5.33 | length 2.5
  Top Layer w0.5: U5.33 CN2.8
D1: CN2.9 U5.32 | length 2.5
  Top Layer w0.5: U5.32 CN2.9
D2: CN2.10 U5.31 | length 2.5
  Top Layer w0.5: U5.31 CN2.10
D3: CN2.11 U5.30 | length 2.5
  Top Layer w0.5: U5.30 CN2.11
D4: CN2.12 U5.29 | length 2.5
  Top Layer w0.5: U5.29 CN2.12
D5: CN2.13 U5.28 | length 2.5
  Top Layer w0.5: U5.28 CN2.13
D6: CN2.14 U5.27 | length 2.5
  Top Layer w0.5: U5.27 CN2.14
D7: CN2.15 U5.26 | length 2.5
  Top Layer w0.5: U5.26 CN2.15
Data: R4.1 U4.40 | length 5.2
  Top Layer w0.25: U4.40 32.518,65.95 v1(32.862,66.294) ; R4.1 33.054,68.938 33.054,68.913 33.693,68.274 33.693,68.167 v1(33.741,68.119)
  Bottom Layer w0.25: v1(32.862,66.294) 33.782,67.214 33.782,68.078 v1(33.741,68.119)
DAV: CN4.6 U3.6 | length 32.3
  Top Layer w0.25: U3.6 8.067,48.277 8.242,48.102 8.242,48.071 8.262,48.051 8.262,47.838 8.692,47.408 v1(8.692,40.386)
  Bottom Layer w0.25: CN4.6 7.932,19.28 5.967,21.245 5.967,37.685 8.668,40.386 v1(8.692,40.386)
Device_ID_1: CN7.7 RN1.1 U4.67 | length 12.8
  Top Layer w0.25: RN1.1 13.196,75.676 16.24,75.676 CN7.7
  Top Layer w0.3: CN7.7 21.428,75.092 U4.67
Device_ID_2: CN7.5 RN1.2 U4.68 | length 12.7
  Top Layer w0.25: RN1.2 12.711,75.699 12.711,76.069 13.445,76.803 14.827,76.803 CN7.5
  Top Layer w0.3: v1(20.697,74.218) 20.685,74.207 20.685,73.817 20.928,73.574 U4.68
  Bottom Layer w0.3: CN7.5 18.55,75.43 20.051,75.43 20.683,74.798 20.683,74.232 v1(20.697,74.218)
DIO1: CN4.1 U2.2 | length 10.6
  Top Layer w0.25: U2.2@3.048,36.068 3.048,36.874 3.182,37.008 3.182,37.163 3.812,37.793 5.336,37.793 6.152,36.977 6.152,34.301 7.357,33.096 7.357,32.784 8.161,31.98 CN4.1
DIO2: CN4.2 U2.3 | length 8.3
  Top Layer w0.25: U2.3 4.257,35.513 4.508,35.262 4.555,35.262 6.907,32.91 6.907,31.555 8.047,30.415 8.047,29.625 CN4.2
DIO3: CN4.3 U2.4 | length 15.1
  Top Layer w0.25: U2.4 5.588,36.068 5.588,36.718 4.963,37.343 3.998,37.343 3.632,36.977 3.632,35.159 6.457,32.334 6.457,31.369 6.907,30.919 6.907,29.015 8.047,27.875 8.047,27.085 CN4.3
DIO4: CN4.4 U2.5 | length 22
  Top Layer w0.25: U2.5@6.858,36.684 7.055,36.882 7.088,36.882 7.549,37.343 10.866,37.343 11.252,36.957 11.252,35.148 13.077,33.323 13.077,26.035 11.402,24.36 8.382,24.36 CN4.4
DIO5: CN4.13 U2.6 | length 6.5
  Top Layer w0.3: U2.6@8.128,36.068 8.128,34.391 10.779,31.74 10.779,30.717 CN4.13
DIO6: CN4.14 U2.7 | length 9.8
  Top Layer w0.25: U2.7@9.398,36.068 9.398,35.418 12.177,32.639 12.177,29.275 11.072,28.17 CN4.14
DIO7: CN4.15 U2.8 | length 12
  Top Layer w0.25: U2.8@10.668,36.068 10.668,34.91 12.627,32.951 12.627,28.194 11.038,26.605 11.038,25.896 CN4.15
DIO8: CN4.16 U2.9 | length 15
  Top Layer w0.25: CN4.16 10.922,23.09 11.222,23.09 13.324,25.192 13.527,25.395 13.527,33.509 11.944,35.092 11.944,36.062 U2.9@11.938,36.068
EOI: CN4.5 U3.7 | length 29.9
  Top Layer w0.25: U3.7 9.404,48.955 9.404,47.969 9.962,47.411 v1(9.962,40.64)
  Bottom Layer w0.25: CN4.5 7.932,21.82 6.417,23.335 6.417,37.151 9.906,40.64 v1(9.962,40.64)
GND: C1.1 C2.1 C3.1 C4.1 C5.1 C6.1 C7.1 C8.1 C9.1 C10.1 C11.1 C12.1 CN1.1 CN4.12 CN4.18 CN4.19 CN4.20 CN4.21 CN4.22 CN4.23 CN4.24 CN5.3 CN6.6 CN7.2 CN7.4 CN7.6 CN7.8 D1.1 D2.1 D3.1 D4.1 Q1.2 Q2.2 U1.2 U2.10 U3.10 U4.21 U4.31 U4.44 U4.62 U4.69 U4.75 U4.84 U4.100 U5.1 | length 309.2
  Top Layer w0.3: D1.1 2.54,66.686 1.27,67.956 1.27,70.271 1.178,70.363 1.178,73.103 ; D2.1 2.54,71.741 1.178,73.103 ; D4.1@2.54,76.583 1.27,75.313 1.27,74.726 1.178,74.634 1.178,73.103 ; C10.1 13.168,66.636 14.114,66.636 14.428,66.95 U4.84 16.783,66.95 16.858,67.025 ; U2.10 U2.10@13.147,36.718 ; U4.100 16.764,58.95 ; 17.428,71.472 U4.75 ; 20.428,71.618 U4.69 ; 23.928,71.5 U4.62 C9.1@23.928,75.063 ; C9.1 24.403,75.538 C9.1@23.928,75.063 ; U4.21 27.428,58.461 v1(27.432,58.465) ; CN5.3 27.812,79.628 23.24,79.628 CN6.6 21.59,76.962 23.489,75.063 C9.1@23.928,75.063 ; 29.718,68.025 29.793,67.95 33.061,67.95 33.842,67.169 C7.1 ; 30.025,61.45 U4.31 32.384,61.45 32.786,61.048 C6.1 ; v1(30.397,72.66) 30.397,74.134 30.951,74.688 C8.1
  Top Layer w0.5: D4.1@2.54,76.583 D4.1 2.54,76.633 6.425,80.518 CN7.2 CN7.4 CN7.6 CN7.8 18.796,80.518 21.336,77.978 CN6.6 ; v1(2.692,34.709) 2.692,34.536 3.192,34.036 C2.1 ; v1(3.048,38.1) 3.316,38.368 11.497,38.368 13.147,36.718 13.584,37.155 v1(13.97,37.155) ; C1.1 v1(4.257,60.452) ; C11.1 13.164,62.6 v1(13.74,62.6) ; U3.10 v1(13.994,49.022) ; U5.1@15.002,50.48 15.552,51.03 U5.1 ; v1(16.218,72.65) 17.396,71.472 17.428,71.472 19.114,69.786 19.428,69.786 ; 16.764,58.95 18.428,60.614 ; 16.858,67.025 19.428,69.595 19.428,69.786 ; v1(17.018,62.738) 17.306,62.45 20.264,62.45 ; v1(18.542,58.928) 18.428,59.042 18.428,60.614 ; 20.428,71.618 22.26,69.786 ; U1.2 21.238,8.128 21.438,8.328 21.637,8.328 21.988,8.679 ; C4.1 21.06,10.772 21.988,9.844 21.988,8.679 ; v1@23.876,69.786 22.26,69.786 ; v1@23.928,69.786 25.764,67.95 ; v1@23.928,69.85 23.928,71.5 ; Q2.2 27.326,13.97 26.416,13.97 ; Q1.2 27.166,17.486 26.416,16.736 26.416,13.97 ; v1(27.432,58.465) 23.611,62.286 23.611,65.797 ; 29.718,68.025 27.779,68.025 27.704,67.95 25.764,67.95 ; 30.025,61.45 25.678,65.797 23.611,65.797 ; 18.428,60.614 20.264,62.45 ; 19.428,69.786 22.26,69.786 ; 20.264,62.45 23.611,65.797 ; 21.988,8.679 21.988,6.999 22.442,6.545 22.442,5.612 C3.1 22.744,5.46 23.712,6.428 23.757,6.428 26.416,9.087 26.416,13.97 ; 23.611,65.797 25.764,67.95
  Top Layer w1: U5.1 CN1.1 20.296,51.03 20.928,51.662 C5.1 ; C12.1 22.365,3.048 v2(22.365,1.27) ; C12.1@22.744,3.427 C3.1
  Bottom Layer w0.3: v1(13.74,62.6) 13.765,62.625 16.905,62.625 v1(17.018,62.738) ; v1(21.353,55.183) 22.014,55.183 22.203,55.372 26.924,55.372 27.432,55.88 v1(27.432,58.465) ; v1(23.876,69.85) 26.686,72.66 v1(30.397,72.66)
  Bottom Layer w0.5: v1(2.692,34.709) 2.692,37.744 v1(3.048,38.1) ; v1(4.257,60.452) 4.257,59.161 13.97,49.448 ; CN1.1 v1(18.542,58.928)
  Bottom Layer w1: CN4.12 8.64,4.04 9.834,2.847 10.695,2.847 CN4.24 ; CN4.18 CN4.19 CN4.20 CN4.21 CN4.22 CN4.23 CN4.24 ; U5.1 15.552,51.03 13.97,49.448 v1(13.97,37.155) 13.97,2.77 ; v2(22.365,1.27) 22.352,1.27 22.302,1.22 14.782,1.22 13.97,2.032 13.97,2.77 ; CN4.24 13.97,2.77
  other v1: 5.842,2.286 13.462,4.826 26.416,4.826 23.876,15.24 20.335,33.25 20.828,35.79 20.828,38.354 34.134,53.34 14.732,55.118 4.572,55.88 23.916,62.992 5.588,63.246 20.838,63.803 26.035,64.148 25.908,65.839 21.336,65.938 24.344,67.321 7.442,76.962 2.286,78.74
GPIB_ATN: U3.13 U4.94 | length 10.1
  Top Layer w0.25: U3.13 10.637,58.491 10.637,57.181 v1(10.668,57.15) ; v1(14.178,62.025) 14.246,62.025 14.321,61.95 U4.94
  Bottom Layer w0.25: v1(10.668,57.15) 10.668,59.809 12.884,62.025 v1(14.178,62.025)
GPIB_ATN_ACK: Q1.1 Q2.1 U4.39 | length 66.4
  Top Layer w0.25: Q2.1 27.566,12.03 28.702,13.166 28.702,15.47 ; Q1.1 28.586,15.586 28.702,15.47 ; v1(28.702,19.558) 28.702,15.47 ; v1(29.464,65.584) 29.532,65.584 29.666,65.45 U4.39 ; v1(35.306,64.77) 35.306,57.981 35.479,57.808 35.479,57.231 35.564,57.146 v1(35.564,56.347)
  Bottom Layer w0.25: v1(28.702,19.558) 29.21,20.066 29.21,51.044 30.138,51.972 30.143,51.972 30.326,52.155 31.581,52.155 35.354,55.928 35.354,56.069 35.564,56.28 v1(35.564,56.347) ; v1(29.464,65.584) 34.458,65.584 35.272,64.77 v1(35.306,64.77)
GPIB_DAV: U3.15 U4.90 | length 15.1
  Top Layer w0.25: U3.15 8.067,59.267 8.262,59.462 8.262,59.62 10.839,62.197 10.839,63.669 12.064,64.894 v1(12.064,64.902) ; U4.90 15.738,63.94 16.578,63.94 v1(17.018,63.5)
  Bottom Layer w0.25: v1(12.064,64.902) 12.766,64.902 12.814,64.95 15.568,64.95 v1(17.018,63.5)
GPIB_DIO1: U2.19 U4.91 | length 27
  Top Layer w0.25: U2.19 2.987,47.485 2.732,47.74 2.732,47.743 2.362,48.113 2.362,49.931 8.712,56.281 8.712,59.434 11.289,62.011 11.289,63.482 12.133,64.327 14.099,64.327 14.966,63.46 15.718,63.46 U4.91
GPIB_DIO2: U2.18 U4.93 | length 25.3
  Top Layer w0.25: U2.18 4.257,47.388 3.887,47.758 3.887,47.858 3.632,48.113 3.632,48.375 3.612,48.395 3.612,49.276 3.632,49.296 3.632,49.931 9.982,56.281 9.982,58.983 9.982,59.431 10.348,59.797 12.189,61.638 12.189,63.11 12.379,63.3 13.649,63.3 13.774,63.175 13.978,63.175 14.703,62.45 U4.93
GPIB_DIO3: U2.17 U4.95 | length 25.4
  Top Layer w0.25: U2.17 5.527,47.391 4.902,48.016 4.902,49.931 11.176,56.205 v1(11.176,56.595) ; U4.95 v1(17.468,61.45)
  Bottom Layer w0.25: v1(11.176,56.595) 11.819,57.238 11.819,59.69 13.579,61.45 v1(17.468,61.45)
GPIB_DIO4: U2.16 U4.96 | length 20.4
  Top Layer w0.25: U2.16 6.797,47.394 6.152,48.039 6.152,49.022 6.172,49.042 6.172,49.931 12.269,56.028 v1(12.269,56.595) ; v1(14.224,60.706) 14.292,60.706 14.536,60.95 U4.96
  Bottom Layer w0.25: v1(12.269,56.595) 12.269,58.751 v1(14.224,60.706)
GPIB_DIO5: U2.15 U4.99 | length 18.2
  Top Layer w0.25: U2.15 8.067,47.397 7.812,47.652 7.812,47.743 7.422,48.133 7.422,49.276 7.442,49.296 7.442,49.931 14.106,56.595 14.106,58.853 14.703,59.45 U4.99
GPIB_DIO6: U2.14 U4.1 | length 17.1
  Top Layer w0.25: U2.14 9.337,47.399 8.712,48.024 8.712,49.931 12.269,53.488 13.902,53.488 13.92,53.505 14.897,53.505 17.428,56.036 U4.1
GPIB_DIO7: U2.13 U4.2 | length 16.4
  Top Layer w0.25: U2.13 10.607,46.313 10.412,46.508 10.412,47.597 10.157,47.852 10.157,47.938 9.982,48.113 9.982,49.931 13.089,53.038 14.089,53.038 14.106,53.055 15.084,53.055 17.928,55.899 U4.2
GPIB_DIO8: U2.12 U4.3 | length 15.7
  Top Layer w0.25: U2.12 11.877,46.313 11.682,46.508 11.682,46.663 11.427,46.918 11.427,47.938 11.252,48.113 11.252,49.931 13.909,52.588 14.414,52.588 14.431,52.605 15.27,52.605 18.403,55.738 18.403,56.64 18.418,56.655 18.418,57.24 U4.3
GPIB_EOI: U3.14 U4.92 | length 10.4
  Top Layer w0.25: U3.14 9.337,59.267 9.532,59.462 9.532,59.617 11.739,61.824 11.739,63.296 12.32,63.877 13.913,63.877 14.839,62.95 U4.92
GPIB_NDAC: U3.17 U4.86 | length 21.5
  Top Layer w0.25: U3.17 5.527,59.077 5.689,59.239 5.972,59.239 9.489,62.756 9.489,64.573 11.655,66.738 11.655,66.755 11.935,67.036 v1(11.935,67.104) ; U4.86 15.738,65.96 16.59,65.96 16.631,66 17.556,66 17.749,66.193 v1(18.542,66.193)
  Bottom Layer w0.25: v1(11.935,67.104) 11.999,67.104 12.207,67.312 16.762,67.312 17.881,66.193 v1(18.542,66.193)
GPIB_NRFD: U3.16 U4.87 | length 18.9
  Top Layer w0.25: U3.16 6.797,59.267 6.992,59.462 6.992,59.623 9.939,62.57 9.939,64.314 11.805,66.18 11.842,66.18 11.976,66.314 v1(12.044,66.314) ; U4.87 16.717,65.45 16.817,65.55 17.985,65.55 v1(18.027,65.592)
  Bottom Layer w0.25: v1(12.044,66.314) 12.044,66.382 12.151,66.489 12.151,66.548 15.243,66.548 16.192,65.599 18.019,65.599 v1(18.027,65.592)
GPIB_RESET: U3.18 U4.85 | length 22.1
  Top Layer w0.25: U3.18 4.257,59.172 4.882,59.797 5.893,59.797 9.039,62.943 9.039,64.759 11.205,66.925 11.205,67.266 v1(11.226,67.287) ; U4.85 17.37,66.45 17.976,67.056 v1(18.034,67.056)
  Bottom Layer w0.25: v1(11.226,67.287) 11.226,67.289 11.756,67.818 17.272,67.818 v1(18.034,67.056)
HOST_F\L\A\G\2\: CN3.1 U4.72 | length 16.2
  Top Layer w0.25: CN3.1 4.979,74.803 5.996,74.803 6.201,75.008 8.728,75.008 9.635,74.101 13.486,74.101 14.053,74.668 17.904,74.668 18.928,73.645 U4.72
HOST_P\C\2\: CN3.10 U4.82 | length 10.8
  Top Layer w0.25: CN3.10 7.901,63.755 7.901,64.271 8.767,65.137 8.767,65.641 11.076,67.95 U4.82
HOST_PA0: CN3.2 U4.74 | length 11.7
  Top Layer w0.25: CN3.2 7.604,73.294 8.717,73.294 8.81,73.201 13.859,73.201 14.426,73.768 17.532,73.768 17.918,73.381 17.918,72.66 U4.74
HOST_PA1: CN3.3 U4.73 | length 16.5
  Top Layer w0.25: CN3.3 5.397,72.681 5.397,73.161 6.717,74.481 8.167,74.481 8.997,73.651 13.673,73.651 14.24,74.218 17.718,74.218 18.418,73.518 18.418,72.66 U4.73
HOST_PA2: CN3.4 U4.77 | length 8.5
  Top Layer w0.25: CN3.4 7.519,70.993 10.626,70.993 11.169,70.45 U4.77
HOST_PA3: CN3.5 U4.76 | length 12.5
  Top Layer w0.25: CN3.5 5.397,70.141 5.397,70.621 6.717,71.941 10.441,71.941 11.432,70.95 U4.76
HOST_PA4: CN3.6 U4.79 | length 8.7
  Top Layer w0.25: CN3.6 7.742,68.376 8.816,69.45 U4.79
HOST_PA5: CN3.7 U4.78 | length 12.3
  Top Layer w0.25: CN3.7 5.397,67.601 5.397,68.081 6.717,69.401 7.677,69.401 8.226,69.95 U4.78
HOST_PA6: CN3.8 U4.81 | length 9.4
  Top Layer w0.25: CN3.8 7.519,65.913 8.403,65.913 10.94,68.45 U4.81
HOST_PA7: CN3.9 U4.80 | length 12.9
  Top Layer w0.25: CN3.9 5.397,65.061 5.397,65.541 7.207,67.351 8.167,67.351 9.766,68.95 U4.80
I\R\Q\: CN2.20 U5.21 | length 2.5
  Top Layer w0.5: U5.21 CN2.20
IEC_PB0: CN1.10 U4.36 | length 47.1
  Top Layer w0.25: U4.36 32.348,63.95 32.424,64.026 v1(32.492,64.026)
  Bottom Layer w0.25: CN1.10 28.31,37.938 28.31,51.417 29.948,53.055 31.208,53.055 34.454,56.301 34.454,57.012 35.11,57.668 35.11,63.323 34.407,64.026 v1(32.492,64.026)
IEC_PB1: CN1.11 U4.10 | length 33.1
  Top Layer w0.25: CN1.11 18.646,25.63 21.928,28.912 U4.10
IEC_PB2: CN1.12 U4.12 | length 36
  Top Layer w0.25: CN1.12 22.928,27.476 U4.12
IEC_PB3: CN1.13 U4.14 | length 38.9
  Top Layer w0.25: CN1.13 23.928,25.936 23.928,55.636 U4.14
IEC_PB4: CN1.14 U4.16 | length 41.9
  Top Layer w0.25: CN1.14 24.917,24.385 24.917,53.632 24.928,53.643 U4.16
IEC_PB5: CN1.15 U4.18 | length 44.8
  Top Layer w0.25: CN1.15 25.817,22.745 25.817,53.26 25.928,53.371 U4.18
IEC_PB6: CN1.16 U4.20 | length 47.8
  Top Layer w0.25: CN1.16 20.935,15.323 20.935,16.05 26.717,21.832 26.717,52.887 26.928,53.098 U4.20
IEC_PB7: CN1.17 U4.23 | length 51
  Top Layer w0.25: CN1.17 18.542,10.632 20.167,12.257 20.167,13.282 21.835,14.95 21.835,15.677 27.617,21.459 27.617,52.514 27.828,52.725 27.828,55.792 28.403,56.367 28.403,56.64 28.418,56.655 28.418,57.24 U4.23
IFC: CN4.9 U3.3 | length 39.4
  Top Layer w0.25: U3.3 4.257,48.277 4.452,48.082 4.452,47.83 4.882,47.4 v1(4.882,39.691)
  Bottom Layer w0.25: v1(4.882,39.691) 4.882,39.074 4.617,38.809 4.617,14.975 7.932,11.66 CN4.9
Kernal_OUT1: CN5.2 U4.49 | length 19.4
  Top Layer w0.25: v1(30.106,70.45) U4.49 ; CN5.2 33.02,82.296 35.18,82.296 35.465,82.011 35.465,76.993 34.605,76.134 34.218,76.134 33.385,75.3 v1(33.385,74.375)
  Bottom Layer w0.25: v1(30.106,70.45) 33.385,73.728 v1(33.385,74.375)
Kernal_OUT2: CN5.1 U4.52 | length 17.4
  Top Layer w0.25: v1(27.686,76.962) 28.314,76.334 28.314,74.524 28.928,73.911 U4.52
  Bottom Layer w0.25: v1(27.686,76.962) 28.564,76.962 28.723,76.803 35.275,76.803 35.465,76.993 35.465,78.963 34.996,79.432 34.759,79.432 34.29,79.901 CN5.1
KernalSelect: CN7.1 RN1.4 U4.71 | length 14.2
  Top Layer w0.25: CN7.1 11.696,77.204 RN1.4
  Top Layer w0.3: U4.71 v1(19.428,74.218)
  Bottom Layer w0.3: CN7.1 14.682,74.218 v1(19.428,74.218)
MODE_IEC: R2.1 U4.42 | length 9.2
  Top Layer w0.25: v1(29.718,66.46) 30.208,66.95 U4.42 ; R2.1 33.042,71.925 33.715,71.252 v1(33.801,71.252)
  Bottom Layer w0.25: v1(29.718,66.46) 29.718,67.169 v1(33.801,71.252)
MODE_IEEE-488: R1.1 U4.43 | length 11.5
  Top Layer w0.25: v1(28.956,66.802) 29.604,67.45 U4.43 ; R1.1 33.042,73.425 33.659,72.808 33.745,72.808 v1(33.793,72.76)
  Bottom Layer w0.25: v1(28.956,66.802) 28.956,67.923 v1(33.793,72.76)
modeSwitch: CN7.3 RN1.3 U4.70 | length 12.8
  Top Layer w0.25: RN1.3 12.196,76.712 CN7.3
  Top Layer w0.3: v1(19.878,74.755) 19.878,74.7 20.028,74.55 20.028,73.9 19.928,73.8 U4.70
  Bottom Layer w0.3: CN7.3 16.51,74.93 19.648,74.93 19.824,74.755 v1(19.878,74.755)
NDAC: CN4.8 Q2.3 U3.4 | length 56.1
  Top Layer w0.25: U3.4 5.594,48.955 5.594,47.961 6.111,47.444 6.111,46.518 6.152,46.477 v1(6.152,39.691)
  Top Layer w0.3: CN4.8 8.532,14.2 9.39,13.342 9.39,12.527 10.233,11.684 v1(15.24,11.684) ; v1(24.638,12.93) 24.65,12.942 25.454,12.942 Q2.3
  Bottom Layer w0.25: v1(6.152,39.691) 6.135,39.691 5.067,38.622 5.067,18.121 7.957,15.23 7.957,14.475 CN4.8
  Bottom Layer w0.3: v1(15.24,11.684) 18.993,11.684 20.239,12.93 v1(24.638,12.93)
NetD1_2: D1.2 R1.2 | length 48.3
  Top Layer w0.25: v1(1.27,63.5) 1.318,63.548 1.318,63.814 2.54,65.036 D1.2 ; v1(34.244,75.328) 34.244,75.278 33.96,74.994 33.96,74.157 34.317,73.8 34.642,73.475 R1.2
  Bottom Layer w0.25: v1(1.27,63.5) 1.27,69.088 1.203,69.155 1.203,72.001 2.413,73.211 5.627,73.211 6.763,72.075 20.885,72.075 24.21,75.4 33.809,75.4 33.834,75.376 34.196,75.376 v1(34.244,75.328)
NetD2_2: D2.2 R2.2 | length 40
  Top Layer w0.25: v1(1.778,70.612) 1.826,70.564 2.083,70.564 2.531,70.116 D2.2 ; R2.2 34.642,71.975 35.417,72.75 35.417,74.06 34.797,74.68 v1(34.642,74.68)
  Bottom Layer w0.25: v1(1.778,70.612) 1.846,70.612 2.1,70.866 5.742,70.866 6.717,69.891 18.963,69.891 20.697,71.625 21.079,71.625 24.404,74.95 33.623,74.95 33.893,74.68 v1(34.642,74.68)
NetD3_2: D3.2 R3.2 | length 39.3
  Top Layer w0.25: R3.2 34.642,70.425 35.066,70.001 35.066,69.922 v1(35.114,69.874)
  Top Layer w0.3: D3.2 9.235,78.486 9.927,79.178 19.104,79.178 19.878,78.404 19.878,77.801 21.928,75.751 21.928,75.094 v1(22.491,74.53)
  Bottom Layer w0.25: 22.473,75.903 34.5,75.903 35.239,75.164 35.239,70.067 35.114,69.942 v1(35.114,69.874)
  Bottom Layer w0.3: 22.473,75.878 22.473,74.548 v1(22.491,74.53)
NetD4_2: D4.2 R4.2 | length 47.9
  Top Layer w0.25: v1(1.778,74.168) 1.778,74.194 2.54,74.956 D4.2 ; R4.2 34.967,68.625 34.967,68.221 v1(35.11,68.078)
  Bottom Layer w0.25: v1(1.778,74.168) 6.858,79.248 18.934,79.248 20.066,78.116 20.066,77.216 20.885,76.397 20.885,76.353 34.686,76.353 35.689,75.35 35.689,68.657 v1(35.11,68.078)
NRFD: CN4.7 Q1.3 U3.5 | length 54.6
  Top Layer w0.25: U3.5 6.864,48.955 6.864,47.963 7.422,47.405 v1(7.422,40.132)
  Top Layer w0.3: CN4.7 8.532,16.74 9.39,15.882 9.39,15.067 10.233,14.224 v1(15.24,14.224) ; v1(25.4,15.748) 25.4,15.802 25.466,15.868 Q1.3
  Bottom Layer w0.25: v1(7.422,40.132) 7.422,40.1 5.517,38.195 5.517,20.211 7.957,17.77 7.957,17.015 CN4.7
  Bottom Layer w0.3: v1(15.24,14.224) 23.876,14.224 v1(25.4,15.748)
Power: R3.1 U4.41 | length 6
  Top Layer w0.25: U4.41 31.138,66.46 32.084,66.46 v1(32.838,67.214) ; R3.1 33.042,70.425 33.608,69.859 33.694,69.859 v1(33.742,69.811)
  Bottom Layer w0.25: v1(32.838,67.214) 32.838,68.908 v1(33.742,69.811)
R/W\: CN2.19 U5.22 | length 2.5
  Top Layer w0.5: U5.22 CN2.19
R\E\S\E\T\: CN2.7 U4.25 U5.34 | length 26.5
  Top Layer w0.25: U4.25 30.013,57.25 30.792,56.471 30.792,52.775 29.428,51.411 29.428,37.154 30.792,35.79 U5.34
  Top Layer w0.5: U5.34 CN2.7
REN: CN4.17 U3.2 | length 38.3
  Top Layer w0.25: U3.2 2.987,48.277 3.182,48.082 3.182,47.927 3.437,47.672 3.437,46.652 3.632,46.457 3.632,39.262 3.778,39.116 v1(9.652,39.116)
  Bottom Layer w0.25: v1(9.652,39.116) 9.617,39.116 8.621,38.12 8.409,38.12 8.043,37.755 6.867,36.578 6.867,23.976 7.776,23.066 8.735,23.066 9.604,22.197 9.604,21.418 10.472,20.55 CN4.17
SRQ: CN4.10 U3.9 | length 61.2
  Top Layer w0.25: U3.9 11.877,47.656 12.522,47.011 12.522,44.659 12.7,44.481 v1(12.7,41.91)
  Bottom Layer w0.25: CN4.10 8.417,8.935 8.417,8.145 9.557,7.005 9.557,6.155 8.957,5.555 7.507,5.555 3.632,9.43 3.632,41.264 5.615,43.247 11.668,43.247 12.652,42.263 12.652,41.958 v1(12.7,41.91)
TalkEnable: U2.1 U3.1 U4.89 | length 42.3
  Top Layer w0.25: U2.1 1.717,41.114 2.342,41.739 2.342,47.497 1.912,47.927 1.912,48.082 1.717,48.277 U3.1 1.717,49.767 1.912,49.962 1.912,50.117 7.442,55.647 7.442,59.436 10.389,62.383 10.389,64.04 11.826,65.477 11.847,65.477 11.975,65.605 v1(12.043,65.605) ; U4.89 15.729,64.449 16.705,64.449 16.922,64.232 17.353,64.232 v1(17.4,64.184)
  Bottom Layer w0.25: v1(12.043,65.605) 12.111,65.605 12.246,65.741 12.291,65.786 15.368,65.786 16.263,64.891 16.326,64.891 16.985,64.232 17.353,64.232 v1(17.4,64.184)
TCK: CN6.3 U4.48 | length 14.2
  Top Layer w0.25: CN6.3 30.385,79.153 32.237,79.153 32.925,78.465 32.925,77.491 32.766,77.332 32.766,74.559 32.251,74.043 32.251,70.351 31.859,69.96 31.138,69.96 U4.48
TDI: CN6.5 U4.45 | length 20.2
  Top Layer w0.25: CN6.5 25.305,79.153 27.157,79.153 27.845,78.465 27.845,77.669 28.711,76.803 31.172,76.803 31.801,76.174 31.801,74.866 31.197,74.262 31.197,72.647 30.635,72.085 30.291,72.085 29.081,70.875 29.081,69.775 30.397,68.46 31.118,68.46 U4.45
TDO: CN6.4 U4.83 | length 19.9
  Top Layer w0.25: U4.83 15.738,67.46 16.459,67.46 17.556,68.557 v1(17.556,68.95) ; CN6.4 26.778,77.87 26.778,74.391 26.924,74.244 v1(27.812,74.244)
  Bottom Layer w0.25: v1(17.556,68.95) 19.166,68.95 23.876,73.66 27.228,73.66 v1(27.812,74.244)
TMS: CN6.2 U4.47 | length 11.2
  Top Layer w0.25: U4.47 31.118,69.46 30.284,69.46 29.531,70.212 29.531,70.688 29.99,71.147 30.103,71.147 30.591,71.635 30.821,71.635 31.647,72.46 31.647,74.076 32.251,74.68 32.251,76.361 31.758,76.853 31.758,77.97 CN6.2
VIA_PA0: U4.6 U5.2 | length 15
  Top Layer w0.25: U4.6 19.928,58.506 20.064,58.642 v1(20.064,58.657)
  Bottom Layer w0.25: U5.2 16.452,48.49 17.627,49.665 19.337,49.665 19.732,50.06 19.732,52.229 19.304,52.657 19.304,57.95 20.011,58.657 v1(20.064,58.657)
VIA_PA1: U4.7 U5.3 | length 14.4
  Top Layer w0.25: v1(19.928,56.021) 20.418,56.512 20.418,57.24 U4.7
  Bottom Layer w0.25: U5.3 16.452,45.95 17.627,47.125 18.839,47.125 20.182,48.468 20.182,52.415 19.861,52.736 19.861,55.887 19.928,55.954 v1(19.928,56.021)
VIA_PA2: U4.8 U5.4 | length 19.9
  Top Layer w0.25: U4.8 v1(20.928,58.42)
  Bottom Layer w0.25: U5.4 16.452,43.41 17.736,44.694 19.606,44.694 20.632,45.72 20.632,54.128 20.311,54.449 20.311,55.591 20.503,55.783 20.503,56.149 20.953,56.599 20.953,58.395 v1(20.928,58.42)
VIA_PA3: U4.9 U5.5 | length 19.9
  Top Layer w0.25: v1(21.353,56.186) 21.353,56.254 21.418,56.319 21.418,57.24 U4.9
  Bottom Layer w0.25: U5.5 16.452,40.87 17.627,42.045 18.839,42.045 21.082,44.288 21.082,54.315 20.761,54.636 20.761,55.405 20.953,55.597 20.953,55.786 v1(21.353,56.186)
VIA_PA4: U4.30 U5.6 | length 36.8
  Top Layer w0.25: U4.30 31.138,60.94 31.967,60.94 32.064,60.844 v1(32.13,60.844)
  Bottom Layer w0.25: U5.6 16.452,38.33 17.627,39.505 25.914,39.505 26.06,39.651 26.06,52.349 29.034,55.323 30.294,55.323 32.139,57.168 32.139,58.428 32.829,59.118 32.829,60.356 32.492,60.693 32.349,60.693 32.198,60.844 v1(32.13,60.844)
VIA_PA5: U4.32 U5.7 | length 40.2
  Top Layer w0.25: U4.32 32.665,61.95 32.862,61.753 v1(32.93,61.753)
  Bottom Layer w0.25: U5.7 16.452,35.79 17.817,37.155 24.764,37.155 26.51,38.901 26.51,52.162 29.221,54.873 30.481,54.873 32.589,56.982 32.589,58.242 33.297,58.949 33.297,61.035 33.284,61.047 33.284,61.365 32.93,61.72 v1(32.93,61.753)
VIA_PA6: U4.33 U5.8 | length 42.8
  Top Layer w0.25: U4.33 31.138,62.44 32.501,62.44 32.541,62.4 33.226,62.4 v1(33.251,62.375)
  Bottom Layer w0.25: U5.8 16.452,33.25 17.817,34.615 22.861,34.615 26.96,38.714 26.96,51.976 29.407,54.423 30.667,54.423 33.039,56.795 33.039,58.055 33.747,58.763 33.747,61.879 v1(33.251,62.375)
VIA_PA7: U4.34 U5.9 | length 45.8
  Top Layer w0.25: U5.9 U5.9@16.452,30.71 ; U4.34 33.411,62.95 33.424,62.937 33.502,62.937 33.515,62.924 33.699,62.924 v1(33.747,62.876)
  Bottom Layer w0.25: U5.9 16.452,30.71 17.817,32.075 20.957,32.075 27.41,38.528 27.41,51.79 29.575,53.955 30.835,53.955 33.554,56.673 33.554,57.933 34.197,58.576 34.197,62.426 v1(33.747,62.876)
VIA_PB0: U4.35 U5.10 | length 48.4
  Top Layer w0.25: U5.10 U5.10@16.452,28.17 ; U4.35 31.129,63.451 34.038,63.451 34.31,63.179 v1(34.378,63.179)
  Bottom Layer w0.25: U5.10 16.452,28.17 17.627,29.345 18.863,29.345 27.86,38.342 27.86,51.603 29.762,53.505 31.022,53.505 34.004,56.487 34.004,57.747 34.647,58.39 34.647,62.842 34.378,63.111 v1(34.378,63.179)
VIA_PB1: U4.37 U5.11 | length 53.4
  Top Layer w0.25: U5.11 U5.11@16.452,25.63 ; U4.37 32.103,64.45 32.537,64.884 32.835,64.884 v1(32.838,64.888)
  Bottom Layer w0.25: U5.11 16.452,25.63 17.627,26.805 18.839,26.805 28.76,36.726 28.76,51.23 30.135,52.605 31.395,52.605 34.904,56.114 34.904,56.826 35.56,57.482 35.56,63.703 34.787,64.476 34.006,64.476 33.588,64.893 32.844,64.893 v1(32.838,64.888)
VIA_PB2: U4.11 U5.12 | length 37.8
  Top Layer w0.25: U5.12 16.452,23.09 17.627,24.265 18.839,24.265 22.428,27.854 U4.11
VIA_PB3: U4.13 U5.13 | length 40.7